# Altium PCB Custom_Keyboard.PcbDoc (part 2 of 4)
Units mil, origin at the board's own origin, x right, y up, seen from the top; angles counter-clockwise.
Board outline 4767 x 2153 mil, 2 copper layers (Top Layer, Bottom Layer), stack 57 mil thick; 298 components, 247 nets, 1117 pads, 576 vias.
Unrouted connection lines stored in the file: 2.
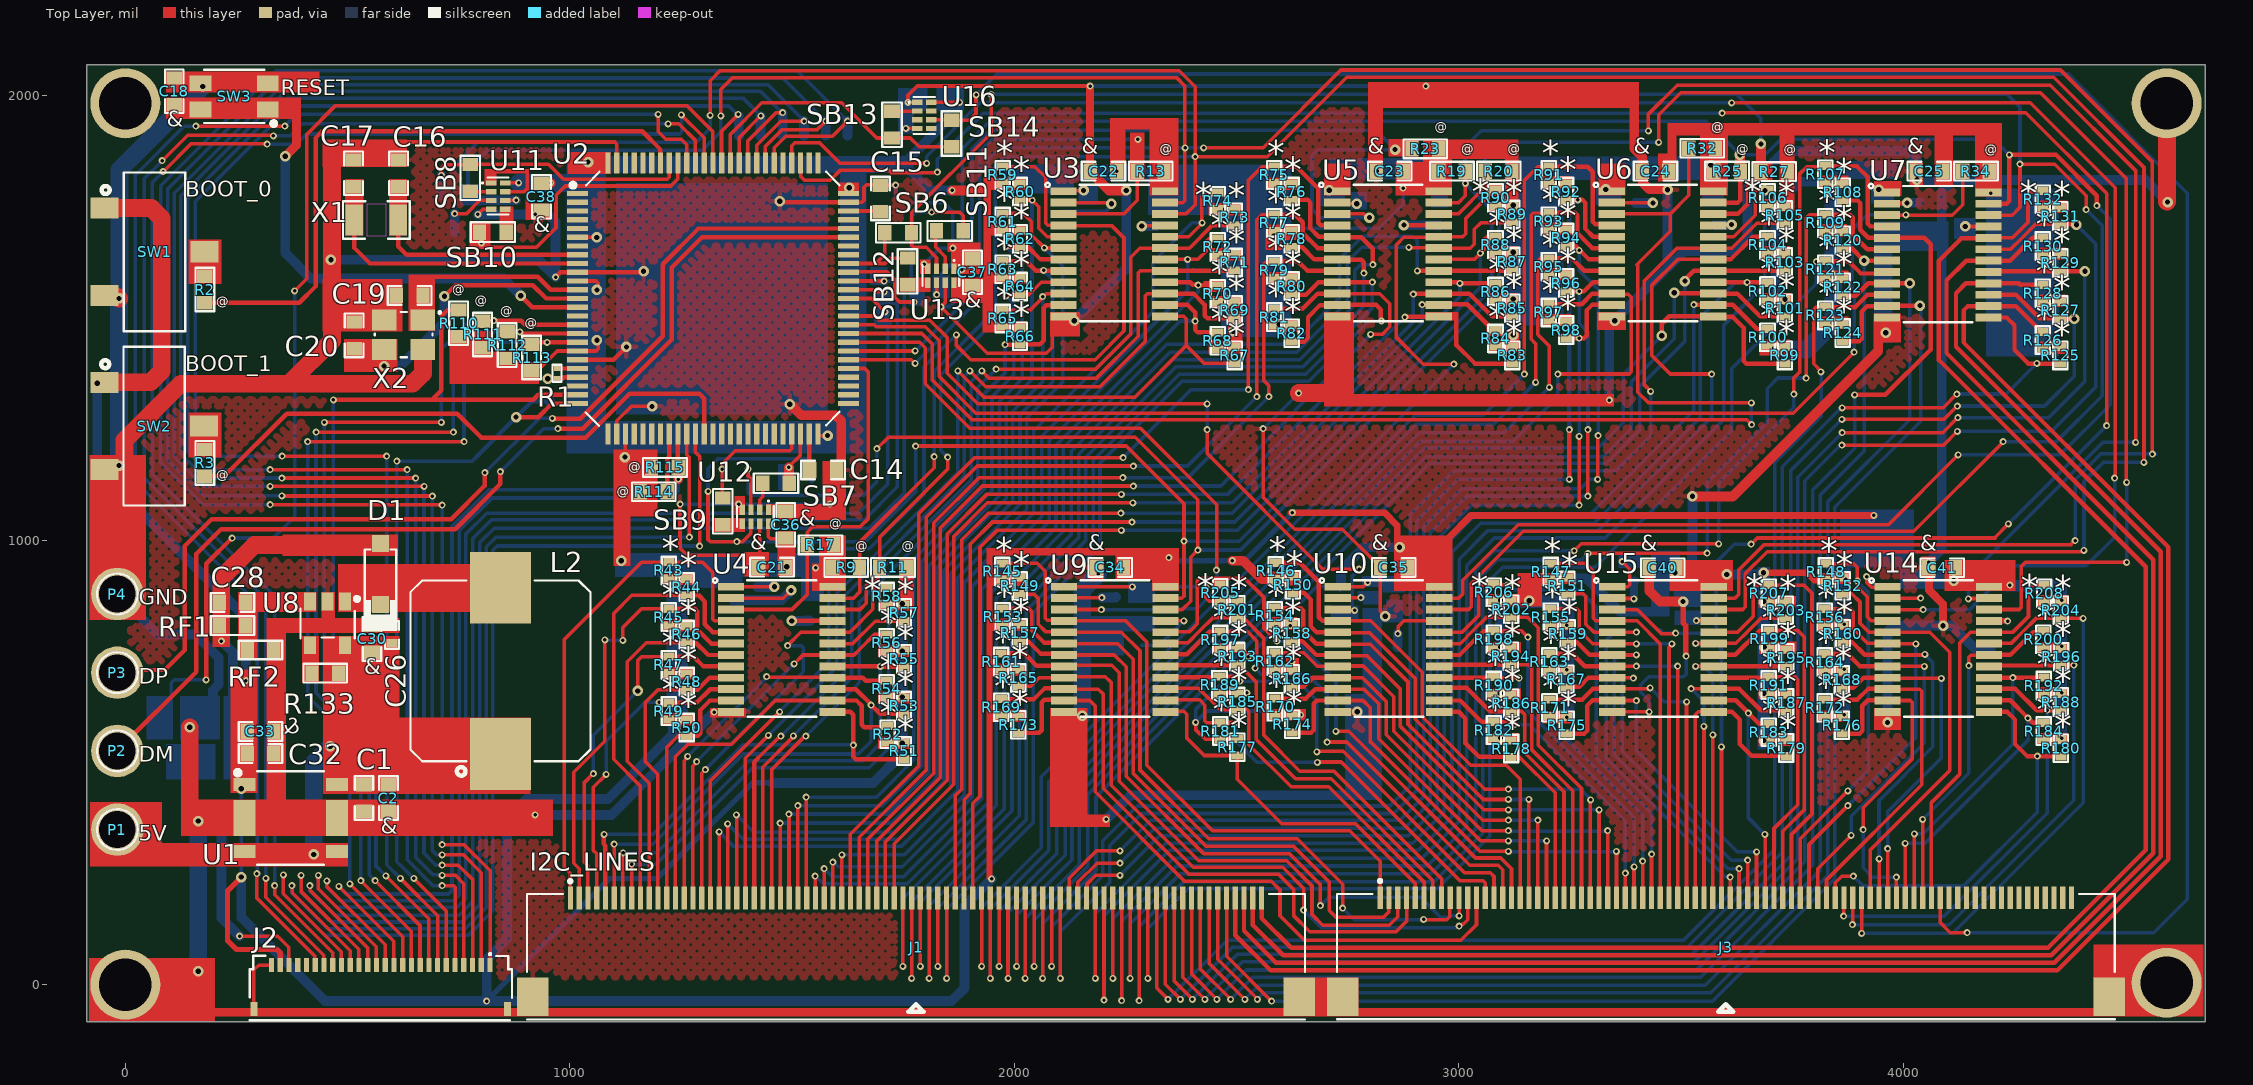
[diagram p0: Top Layer view]

## Part data (continued)
R1: library part RC0201JR-070RL, "RES SMD 0 OHM JUMPER 1/20W 0201", Case Code (Imperial)=0201, Case Code (Metric)=0603, Manufacturer=Yageo, Max Operating Temperature=125°C, Max Power Dissipation=50mW, Min Operating Temperature=-55°C, Package Quantity=10000, Resistance Tolerance=5%, Resistor Type="Thick Film", Supplier Part Number 1=311-0.0NCT-ND, Voltage Rating=25V, Case/Package=0201, Category="Chip SMD Resistors", ComponentLink1Description=https://datasheet.ciiva.com/7672/1563626-7672247.pdf?src-supplier=Element14, ComponentLink1URL=https://datasheet.ciiva.com/7672/1563626-7672247.pdf?src-supplier=Element14, ComponentLink2Description=https://datasheet.ciiva.com/7660/1421516-7660808.pdf?src-supplier=Element14, ComponentLink2URL=https://datasheet.ciiva.com/7660/1421516-7660808.pdf?src-supplier=Element14, ComponentLink3Description=https://datasheet.ciiva.com/7672/1563626-7672248.pdf?src-supplier=Element14, ComponentLink3URL=https://datasheet.ciiva.com/7672/1563626-7672248.pdf?src-supplier=Element14, ComponentLink4Description=https://datasheet.ciiva.com/16855/pyu-rc0201-51-rohs-l-8-16855994.pdf?src-supplier=Avnet+Europe, ComponentLink4URL=https://datasheet.ciiva.com/16855/pyu-rc0201-51-rohs-l-8-16855994.pdf?src-supplier=Avnet+Europe, ComponentLink5Description=https://datasheet.ciiva.com/28419/pyu-rc0201-51-rohs-l-8-28419660.pdf?src-supplier=Avnet+Europe, ComponentLink5URL=https://datasheet.ciiva.com/28419/pyu-rc0201-51-rohs-l-8-28419660.pdf?src-supplier=Avnet+Europe, ComponentLink6Description=https://datasheet.ciiva.com/46391/1421516-46391340.pdf?src-supplier=Element14, ComponentLink6URL=https://datasheet.ciiva.com/46391/1421516-46391340.pdf?src-supplier=Element14, ComponentLink7Description=https://datasheet.ciiva.com/8896/pyu-rc0201-51-rohs-l-8-8896143.pdf?src-supplier=Avnet, ComponentLink7URL=https://datasheet.ciiva.com/8896/pyu-rc0201-51-rohs-l-8-8896143.pdf?src-supplier=Avnet, Construction=Rectangular, Contact Plating=Tin,Matte, Depth=0.3mm, Features="Moisture Resistant", Height=0.01inch, Lead Free="Lead Free", Length=0.6mm, Manufacturer Part Number=RC0201JR-070RL, Military Standard=Not, Number of Terminations=2, Packaging="Tape and Reel", Power Rating=50mW, Pricing 1="1=0.10000, 10=0.03600, 25=0.02640, 50=0.02000, 100=0.01480, 250=0.01128, 500=0.00904, 1000=0.00665, 5000=0.00477 (USD)", Radiation Hardening=No, REACH SVHC=Unknown, Resistance=0R, RoHS=Yes, RoHS Compliant=Yes, Series=RC, Size Code=0201, Stock 1=11079, Supplier 1=Digi-Key, Termination=SMD/SMT, Tolerance=5%, Voltage Rating (DC)=25V, Weight=6E-06oz, Width=0.012inch
R2 R3 R6 R7 R8 R9 R10 R11 R12 R13 R14 R15 R16 R17 R18 R19 R20 R21 R22 R23 R24 R25 R26 R27 R28 R29 R30 R31 R32 R33 R34 R35 R36 R37 R38 R39 R40 R41 R42 R110 R111 R112 R113 R114 R115 R116 R117 R118 R119 R134 R135 R136 R137 R138 R139 R140 R141 R142 R143 R144: library part AC0603JR-0710KL, "RES SMD 10K OHM 5% 1/10W 0603", Case Code (Imperial)=0603, Case Code (Metric)=1608, Manufacturer=Yageo, Max Operating Temperature=155°C, Max Power Dissipation=100mW, Min Operating Temperature=-55°C, Package Quantity=1, Resistance=10kR, Resistor Type="Thick Film", Supplier Part Number 1=1029044, Temperature Coefficient=100ppm/°C, Tolerance=5%, Voltage Rating=50V, Case/Package=0603, Category="Chip SMD Resistors", ComponentLink1Description=https://datasheet.ciiva.com/5562/pyu-ac-51-rohs-l-2-5562553.pdf?src-supplier=Mouser, ComponentLink1URL=https://datasheet.ciiva.com/5562/pyu-ac-51-rohs-l-2-5562553.pdf?src-supplier=Mouser, Construction=Rectangular, Depth=0.8mm, Features="Moisture Resistant,Automotive AEC-Q200,Anti-Sulfur", Height=0.022inch, Lead Free="Lead Free", Length=0.063inch, Manufacturer Part Number=AC0603JR-0710KL, Military Standard=Not, Number of Terminations=2, Packaging="Tape and Reel", Power Rating=100mW, Pricing 1="5000=0.00540 (USD)", RoHS=Yes, RoHS Compliant=Yes, Series=AC, Size Code=0603, Stock 1=1533000, Supplier 1="Future Electronics", Termination=SMD/SMT, Width=0.031inch
R4 R5 R43 R44 R45 R46 R47 R48 R49 R50 R51 R52 R53 R54 R55 R56 R57 R58 R59 R60 R61 R62 R63 R64 R65 R66 R67 R68 R69 R70 R71 R72 R73 R74 R75 R76 R77 R78 R79 R80 R81 R82 R83 R84 R85 R86 R87 R88 R89 R90 R91 R92 R93 R94 R95 R96 R97 R98 R99 R100 R101 R102 R103 R104 R105 R106 R107 R108 R109 R120 R121 R122 R123 R124 R125 R126 R127 R128 R129 R130 R131 R132 R145 R146 R147 R148 R149 R150 R151 R152 R153 R154 R155 R156 R157 R158 R159 R160 R161 R162 R163 R164 R165 R166 R167 R168 R169 R170 R171 R172 R173 R174 R175 R176 R177 R178 R179 R180 R181 R182 R183 R184 R185 R186 R187 R188 R189 R190 R191 R192 R193 R194 R195 R196 R197 R198 R199 R200 R201 R202 R203 R204 R205 R206 R207 R208: library part RC0402FR-0747KL, "RES SMD 47K OHM 1% 1/16W 0402", Case Code (Imperial)=0402, Case Code (Metric)=1005, Manufacturer=Yageo, Max Operating Temperature=155°C, Max Power Dissipation=63mW, Min Operating Temperature=-55°C, Package Quantity=1, Power Rating=62.5mW, Resistance=47kR, Supplier Part Number 1=311-47.0KLRDKR-ND, Temperature Coefficient=100ppm/°C, Tolerance=1%, Voltage Rating=50V, Case/Package=0402, ComponentLink1Description=http://www.yageo.com/documents/recent/PYu-RC0402_51_RoHS_L_6_r.pdf?src-supplier=Future+Electronics, ComponentLink1URL=http://www.yageo.com/documents/recent/PYu-RC0402_51_RoHS_L_6_r.pdf?src-supplier=Future+Electronics, ComponentLink2Description=http://www.farnell.com/datasheets/1018594.pdf?src-supplier=Element14, ComponentLink2URL=http://www.farnell.com/datasheets/1018594.pdf?src-supplier=Element14, ComponentLink3Description=https://www.verical.com/server-webapp/html/getDatasheet?partID=323748&src-supplier=Verical, ComponentLink3URL=https://www.verical.com/server-webapp/html/getDatasheet?partID=323748&src-supplier=Verical, ComponentLink4Description=http://www.yageo.com/documents/recent/PYu-RC_Group_51_RoHS_L_10.pdf?src-supplier=Digi-Key, ComponentLink4URL=http://www.yageo.com/documents/recent/PYu-RC_Group_51_RoHS_L_10.pdf?src-supplier=Digi-Key, Composition="Thick Film", Depth=0.5mm, Features="Moisture Resistant", Height=0.016inch, Lead Free="Lead Free", Length=1mm, Manufacturer Part Number=RC0402FR-0747KL, Military Standard=Not, Number of Terminations=2, Packaging="Tape and Reel", Pricing 1="1=0.1, 10=0.016, 100=0.0064, 1000=0.00289, 2500=0.00251, 5000=0.00207 (USD)", REACH SVHC=Unknown, Stock 1=0, Supplier 1=Digi-Key, Termination=SMD/SMT, Width=0.5mm
R133: library part RMCF0603FT51K0, "Res Thick Film 0603 51K Ohm 1% 0.1W(1/10W) ±100ppm/C Pad SMD Automotive T/R", Case Code (Imperial)=0603, Case Code (Metric)=1608, Manufacturer="Stackpole Electronics", Max Operating Temperature=155°C, Max Power Dissipation=100mW, Min Operating Temperature=-55°C, Resistance=51kR, Resistor Type="Thick Film", Supplier Part Number 1=RMCF0603FT51K0CT-ND, Temperature Coefficient=100ppm/°C, Tolerance=1%, Case/Package=0603, Category="Chip SMD Resistors", ComponentLink1Description=http://components.arrow.com/part/dataview/40961090S7167716N1174?src-supplier=Arrow+Electronics, ComponentLink1URL=http://components.arrow.com/part/dataview/40961090S7167716N1174?src-supplier=Arrow+Electronics, ComponentLink2Description=https://www.seielect.com/catalog/SEI-RMCF_RMCP.pdf?src-supplier=Avnet, ComponentLink2URL=https://www.seielect.com/catalog/SEI-RMCF_RMCP.pdf?src-supplier=Avnet, ComponentLink3Description=https://www.seielect.com/catalog/SEI-Packaging.pdf?src-supplier=Digi-Key, ComponentLink3URL=https://www.seielect.com/catalog/SEI-Packaging.pdf?src-supplier=Digi-Key, Contact Plating=Tin,Matte, Features="Automotive AEC-Q200", Height=0.022inch, Length=0.061inch, Manufacturer Part Number=RMCF0603FT51K0, Mount="Surface Mount", Number of Terminations=2, Packaging="Tape and Reel", Pricing 1="1=0.10000, 10=0.01700, 100=0.00680, 1000=0.00305, 2500=0.00264 (USD)", Radiation Hardening=No, RoHS=Yes, RoHS Compliant=Yes, Series=RMCF, Stock 1=628549, Supplier 1=Digi-Key, Width=0.031inch
RF1: library part RC0603FR-0768KL, "RES SMD 68K OHM 1% 1/10W 0603", Case Code (Imperial)=0603, Case Code (Metric)=1608, Manufacturer=Yageo, Max Operating Temperature=155°C, Max Power Dissipation=100mW, Min Operating Temperature=-55°C, Package Quantity=1, Resistance=68kR, Supplier Part Number 1=311-68.0KHRCT-ND, Temperature Coefficient=100ppm/°C, Tolerance=1%, Voltage Rating=50V, Case/Package=0603, ComponentLink1Description=http://www.yageo.com/documents/recent/PYu-RC_Group_51_RoHS_L_10.pdf?src-supplier=Digi-Key, ComponentLink1URL=http://www.yageo.com/documents/recent/PYu-RC_Group_51_RoHS_L_10.pdf?src-supplier=Digi-Key, ComponentLink2Description=http://documents.rs-components.com/techlib://itc_doclist_GB.htm?stockno=5048243&src-supplier=RSComponents, ComponentLink2URL=http://documents.rs-components.com/techlib://itc_doclist_GB.htm?stockno=5048243&src-supplier=RSComponents, ComponentLink3Description=http://www.yageo.com/documents/recent/PYu-RC_Group_51_RoHS_L_9.pdf?src-supplier=Digi-Key, ComponentLink3URL=http://www.yageo.com/documents/recent/PYu-RC_Group_51_RoHS_L_9.pdf?src-supplier=Digi-Key, ComponentLink4Description=http://www.farnell.com/datasheets/1868787.pdf?src-supplier=Element14, ComponentLink4URL=http://www.farnell.com/datasheets/1868787.pdf?src-supplier=Element14, ComponentLink5Description=http://www.farnell.com/datasheets/443971.pdf?src-supplier=Element14, ComponentLink5URL=http://www.farnell.com/datasheets/443971.pdf?src-supplier=Element14, ComponentLink6Description=http://www.farnell.com/datasheets/2167052.pdf?src-supplier=Element14, ComponentLink6URL=http://www.farnell.com/datasheets/2167052.pdf?src-supplier=Element14, Composition="Thick Film", Depth=0.8mm, Features="Moisture Resistant", Height=0.022inch, Lead Free="Lead Free", Length=0.063inch, Manufacturer Part Number=RC0603FR-0768KL, Number of Pins=2, Number of Terminations=2, Packaging="Tape and Reel", Power Rating=100mW, Pricing 1="1=0.1, 10=0.023, 100=0.0094, 1000=0.00421, 2500=0.00366 (USD)", REACH SVHC=Unknown, Stock 1=3330967, Supplier 1=Digi-Key, Termination=SMD/SMT, Voltage Rating (DC)=50V, Width=0.031inch
RF2: library part AC0603FR-0713K3L, "RES SMD 13.3K OHM 1% 1/10W 0603", Case/Package=0603, Manufacturer=Yageo, Max Operating Temperature=155°C, Max Power Dissipation=100mW, Min Operating Temperature=-55°C, Resistance=13.3kR, Resistor Type="Thick Film", Supplier Part Number 1=13-AC0603FR-0713K3LCT-ND, Temperature Coefficient=100ppm/°C, Tolerance=1%, Category="Chip SMD Resistors", ComponentLink1Description=http://www.yageo.com/NewPortal/yageodocoutput?fileName=/pdf/R-Chip/PYu-AC_51_RoHS_L_6.pdf&src-supplier=Digi-Key, ComponentLink1URL=http://www.yageo.com/NewPortal/yageodocoutput?fileName=/pdf/R-Chip/PYu-AC_51_RoHS_L_6.pdf&src-supplier=Digi-Key, Features="Moisture Resistant,Automotive AEC-Q200", Height=0.022inch, Length=0.063inch, Manufacturer Part Number=AC0603FR-0713K3L, Number of Terminations=2, Packaging="Tape and Reel", Pricing 1="1=0.10000, 10=0.02900, 100=0.01170, 1000=0.00527, 2500=0.00458 (USD)", RoHS=Yes, RoHS Compliant=Yes, Stock 1=500, Supplier 1=Digi-Key, Width=0.031inch
SB1 SB2 SB3 SB4 SB5 SB6 SB7 SB8 SB9 SB10 SB11 SB12 SB13 SB14: "Solder Bridge ON"
SW1 SW2: "SPDT 50mA @ 12VDC 12V On-On SMD Toggle Switches RoHS", Contact Rating @ Voltage="50mA @ 12VDC", Manufacturer="XKB Connectivity", Operating Force=200±100gf, Package=SMD, Rated Voltage(DC)=12V, Actuator Orientation=Vertical, Actuator Type=Standard, Circuit=SPDT, Contact Finish=Silver, Contact Material=Brass, Electrical Life Cycles=10000, Mounting Type="Surface Mount", Switch Height=3mm
SW3: "3mm 2mm Round Button 50mA Top3.65mm SPST 12V SMD Tactile Switches", Manufacturer=XKB, Package=Custom, ComponentLink1Description=LCSC, ComponentLink1URL=https://lcsc.com/product-detail/Tactile-Switches_XKB-Connectivity-TS-1185EC-C-D-B_C318893.html, Manufacturer Part No=TS-1185EC-C-D-B
U1: "IC REG LINEAR 3.3V 1A 6HSOP", Manufacturer=ABLIC, Supplier Part Number 1=1662-1407-1-ND, Category="Voltage Regulators - Linear", Manufacturer Part Number=S-1172B33-E6T1U, Pricing 1="1=1.61000, 10=1.43800, 25=1.36520, 100=1.12150, 250=1.04832, 500=0.92644, 1000=0.73140 (USD)", RoHS=Yes, RoHS Compliant=Yes, Stock 1=7813, Supplier 1=Digi-Key
U2: "IC MCU 32BIT 1MB FLASH 100LQFP", Case/Package=LQFP, Frequency=168MHz, Manufacturer=STMicroelectronics, Max Operating Temperature=105°C, Max Power Dissipation=465mW, Min Operating Temperature=-40°C, Category=Microcontrollers, ComponentLink1Description=https://datasheet.ciiva.com/48494/dm00037051-48494023.pdf?src-supplier=Avnet, ComponentLink1URL=https://datasheet.ciiva.com/48494/dm00037051-48494023.pdf?src-supplier=Avnet, Core Architecture=ARM, Data Bus Width=32b, Interface=I2C,SPI,USB,CAN,Ethernet,IrDA,UART,USART,LIN,EBI/EMI,I2S, Manufacturer Part Number=STM32F407VGT7TR, Max Frequency=168MHz, Memory Size=1MB, Memory Type=FLASH, Number of I/Os=82, Number of Pins=100, Number of Programmable I/O=82, Number of Timers/Counters=14, Oscillator Type=Internal, Packaging="Tape and Reel", Peripherals="Brown-out Detect/Reset,POR,PWM,WDT,DMA,LCD", Pricing 1="1000=8.54203, 2000=8.32301, 4000=8.19785, 6000=8.07269, 8000=7.97882, 10000=7.82238, 100000=7.69722 (USD)", Radiation Hardening=No, RAM Size=196KB, RoHS=Yes, RoHS Compliant=Yes, Supplier 1=Avnet, Supplier Part Number 1=STM32F407VGT7TR, Watchdog Timer=Yes
U3 U4 U5 U6 U7 U9 U10 U14 U15: "IC BUS SWITCH 1 X 8:1 24TSSOP", Case/Package=TSSOP, Manufacturer="Texas Instruments", Max Operating Temperature=85°C, Max Supply Current=80uA, Max Supply Voltage=5.5V, Min Operating Temperature=-40°C, Min Supply Voltage=1.65V, On-State Resistance=70R, Package Quantity=1, Supplier Part Number 1=296-34905-1-ND, Category="Decoders and Multiplexers", ComponentLink1Description=https://datasheet.ciiva.com/6614/tca9548a-6614721.pdf?src-supplier=Digi-Key, ComponentLink1URL=https://datasheet.ciiva.com/6614/tca9548a-6614721.pdf?src-supplier=Digi-Key, Contact Plating=Gold, Independent Circuits=1, Lead Free="Lead Free", Manufacturer Part Number=TCA9548APWR, Mount="Surface Mount", Number of Pins=24, Packaging="Tape and Reel", Pricing 1="1=2.09000, 10=1.87600, 25=1.77040, 100=1.50820, 250=1.41616, 500=1.23914, 1000=1.16900 (USD)", REACH SVHC="No SVHC", RoHS=Yes, Supplier 1=Digi-Key, Supply Type=Single
U8: "IC REG BOOST ADJ 0.8A SOT23-5", Case/Package=SOT-23-5, Manufacturer="TI National Semiconductor", Max Input Voltage=14V, Max Operating Temperature=125°C, Max Output Current=800mA, Max Output Voltage=28V, Min Input Voltage=2.7V, Min Operating Temperature=-40°C, Min Output Voltage=4V, Output Power=2.5W, Package Quantity=1, Quiescent Current=2.1mA, Supplier Part Number 1=926-LM27313XMF/NOPB, Switching Frequency=1.6MHz, Category="Voltage Regulators - Switching", ComponentLink1Description=https://datasheet.ciiva.com/22669/1775263-22669473.pdf?src-supplier=Element14, ComponentLink1URL=https://datasheet.ciiva.com/22669/1775263-22669473.pdf?src-supplier=Element14, ComponentLink2Description=https://datasheet.ciiva.com/27056/2038467-27056413.pdf?src-supplier=Jameco, ComponentLink2URL=https://datasheet.ciiva.com/27056/2038467-27056413.pdf?src-supplier=Jameco, ComponentLink3Description=https://datasheet.ciiva.com/23605/37176-23605316.pdf?src-supplier=Newark, ComponentLink3URL=https://datasheet.ciiva.com/23605/37176-23605316.pdf?src-supplier=Newark, ComponentLink4Description=https://datasheet.ciiva.com/25627/0900766b810fa43d-25627220.pdf?src-supplier=RSComponents, ComponentLink4URL=https://datasheet.ciiva.com/25627/0900766b810fa43d-25627220.pdf?src-supplier=RSComponents, ComponentLink5Description=https://datasheet.ciiva.com/15113/getdatasheetpartid-203533-15113382.pdf?src-supplier=Verical, ComponentLink5URL=https://datasheet.ciiva.com/15113/getdatasheetpartid-203533-15113382.pdf?src-supplier=Verical, ComponentLink6Description=https://datasheet.ciiva.com/3220/lm27313-q1-3220064.pdf?src-supplier=Avnet, ComponentLink6URL=https://datasheet.ciiva.com/3220/lm27313-q1-3220064.pdf?src-supplier=Avnet, ComponentLink7Description=https://datasheet.ciiva.com/6603/lm27313-6603792.pdf?src-supplier=Digi-Key, ComponentLink7URL=https://datasheet.ciiva.com/6603/lm27313-6603792.pdf?src-supplier=Digi-Key, ComponentLink8Description=https://datasheet.ciiva.com/6603/lm27313-6603791.pdf?src-supplier=Digi-Key, ComponentLink8URL=https://datasheet.ciiva.com/6603/lm27313-6603791.pdf?src-supplier=Digi-Key, ComponentLink9Description=https://datasheet.ciiva.com/6603/lm27313-6603788.pdf?src-supplier=Digi-Key, ComponentLink9URL=https://datasheet.ciiva.com/6603/lm27313-6603788.pdf?src-supplier=Digi-Key, Contact Plating=Tin, Efficiency=80%, Height=1.02mm, Lead Free="Lead Free", Length=2.92mm, Manufacturer Part Number=LM27313XMF/NOPB, Mount="Surface Mount", Number of Outputs=1, Number of Pins=5, Output Configuration=Positive, Output Current=800mA, Output Type=Adjustable, Output Voltage=28V, Packaging="Tape and Reel", Pricing 1="1=2.17000, 10=1.96000, 25=1.85000, 50=1.85000, 100=1.58000, 250=1.48000, 500=1.30000, 1000=1.07000, 10000=1.07000 (USD)", Radiation Hardening=No, REACH SVHC="No SVHC", RoHS=Yes, RoHS Compliant=Yes, Series=LM27313, Supplier 1=Mouser, Synchronous Rectifier=No, Topology=Boost, Width=1.6mm
U11 U12 U13 U16: "IC BUFFER NON-INVERT 5.5V 8DFN", High Level Output Current=32mA, Manufacturer=Diodes, Max Operating Temperature=125°C, Min Operating Temperature=-40°C, Supplier Part Number 1=74LVC2G125HD4-7DIDKR-ND, Category="Logic Gates", ComponentLink1Description=https://www.diodes.com/assets/Datasheets/74LVC2G125.pdf?src-supplier=Digi-Key, ComponentLink1URL=https://www.diodes.com/assets/Datasheets/74LVC2G125.pdf?src-supplier=Digi-Key, Logic Function=Buffer,Inverting, Low Level Output Current=32mA, Manufacturer Part Number=74LVC2G125HD4-7, Mount="Surface Mount", Number of Bits per Element=1, Number of Elements=2, Number of Pins=8, Packaging="Tape and Reel", Pricing 1="1=0.47000, 10=0.35300, 25=0.30880, 100=0.19980, 250=0.16536, 500=0.13228, 1000=0.10142, 2500=0.08819 (USD)", RoHS=Yes, RoHS Compliant=Yes, Supplier 1=Digi-Key
X1: library part Q13FC1350000200, "32.768kHz SMD Crystal Resonator 7pF 70kΩ ±20ppm", Equivalent Series Resistance (ESR)=70kΩ, Frequency=32.768kHz, Load Capacitance=7pF, Manufacturer="Seiko Epson", Crystal Type="SMD Crystal Resonator"
X2: library part S3225000101040, "25MHz SMD Crystal Resonator 10pF 40Ω ±10ppm", Equivalent Series Resistance (ESR)=40Ω, Load Capacitance=10pF, Manufacturer=JGHC, Crystal Type="SMD Crystal Resonator", Frequency=25MHz

## Free pads (board coordinates)
  round 157.48 hole 118.11: MH1(0,0) MH2(4593,4) MH3(4593,1983) MH4(0,1983)

## Via types
v1: diameter 15.75, hole 7.87, Top Layer to Bottom Layer, tented both sides, 451 vias
v2: diameter 23.62, hole 11.81, Top Layer to Bottom Layer, tented both sides, 125 vias

## Nets (pads, with @x,y where several pads share a name; then routed paths per layer and width w, separated by ;. In a path a pad name is that pad's centre, name@x,y a point inside that pad or via, vN(x,y) a via of type N, cw(c..) or ccw(c..) an arc to the next point about the centre after c; other vN are vias at no path point)
BOOT0: R2.1 U2.94 | length 1427.5
  Top Layer w10: R2.1@179,1534 391,1534 428,1571 428,1905 443,1920 1163,1920 1204,1879 U2.94@1204,1849
BOOT1: R3.1 U2.37 | length 1329.6
  Top Layer w10: R3.1@179,1144 222.14,1144 363.02,1284.87 747.13,1284.87 801,1231 1036,1231 1135,1330 1291,1330 1302.43,1318.57 U2.37@1302.43,1238.76
COl_1: J2.1 R6.1 U2.81 | length 4363.3
  Top Layer w8: v1(326,1080) 326.5,1079.5 712.5,1079.5 v1(713,1079) ; v1@709.13,315 v1(713,315) 762,315 820.76,256.24 J2.1@820.76,44 ; U2.81@1459.91,1849 1459.91,1882.91 1486,1909 1591,1909 v1(1625,1943)
  Bottom Layer w8: v1(326,1080) 175,1080 80,1175 80,1797.56 338.44,2056 1512,2056 v1(1625,1943) ; v1(713,315) v1(713,1079)
  Bottom Layer w22: R6.1@1625,1910 v1(1625,1943)
COl_2: J2.2 R37.1 U2.82 | length 4233.3
  Top Layer w8: v1(352,1100) 352.5,1099.5 690.5,1099.5 v1(691,1099) ; v1@709.13,292 v1(713,292) 761,292 801.08,251.92 J2.2@801.08,44 ; U2.82@1440.22,1849 1440.22,1886.22 1478,1924 1557,1924 v1(1576,1943)
  Bottom Layer w8: v1(352,1100) 176.21,1100 95,1181.21 95,1790 345,2040 1479,2040 v1(1576,1943) ; v1(691,1099) 691,301 700,292 v1(713,292)
  Bottom Layer w22: R37.1@1576,1910 v1(1576,1943)
COl_3: J2.3 R38.1 U2.83 | length 4093
  Top Layer w8: v1(326,1121) v1(672,1121) ; v1@709.13,269 v1(713,269) 749,269 781.39,236.61 J2.3@781.39,44 ; U2.83@1420.54,1849 1420.54,1888.54 1475,1943 v1(1527,1943)
  Bottom Layer w8: v1(326,1121) 177,1121 110,1188 110,1781 354,2025 1446,2025 v1@1528,1943 ; v1(672,1121) 672,295.69 698.69,269 v1(713,269)
  Bottom Layer w22: R38.1@1527,1910 v1(1527,1943)
COl_4: J2.4 R39.1 U2.84 | length 3982.8
  Top Layer w8: v1(352,1140) v1(653,1140) ; v1@709.13,246 v1(713,246) 743,246 761.71,227.29 J2.4@761.71,44 ; U2.84@1400.9,1847.28 1400.9,1898.9 1464,1962 v1(1479,1962)
  Bottom Layer w8: v1(352,1140) 179.57,1140 125,1194.57 125,1774.64 360.36,2010 1429,2010 v1@1479,1960 ; v1(653,1140) 653,287 693.13,246.87 712.13,246.87 v1(713,246)
  Bottom Layer w22: R39.1@1478,1910 1479,1911 v1@1479,1960
COl_5: J2.5 R40.1 U2.85 | length 3836.5
  Top Layer w8: v1(326,1159) v1(634,1159) ; v1(713,223) 738,223 742.02,218.98 J2.5@742.02,44 ; U2.85@1381.17,1849 1381.17,1906.17 v1(1430,1955)
  Bottom Layer w8: v1(326,1159) 181.79,1159 140,1200.79 140,1768.43 365.57,1994 1391,1994 v1(1430,1955) ; v1(634,1159) 634,281 692,223 v1(713,223)
  Bottom Layer w22: R40.1@1429,1909 v1@1429,1954
COl_6: J2.6 R41.1 U2.25 | length 1731
  Top Layer w8: v1(649,239) 722.34,165.66 J2.6@722.34,44
  Top Layer w10: v2(879,1277) 929.34,1277 960,1307.66 U2.25@1016.99,1307.66
  Bottom Layer w8: v1(649,239) 648.59,239 622.49,265.09 611,276.59 v1(611,1178) 780,1178 789,1187
  Bottom Layer w10: 789,1187 v2(879,1277) 914.31,1312.31 R41.1@954.31,1312.31
  Bottom Layer w22: R41.1@954.31,1312.31 R41.1@955,1313
COl_7: J2.7 R42.1 U2.87 | length 3679.7
  Top Layer w8: v1(353,1189) v1(588,1189) ; v1(619,239) 702.65,155.35 J2.7@702.65,44 ; U2.87@1341.8,1849 1341.4,1849.4 1341.4,1920.4 v1(1379,1958)
  Bottom Layer w8: v1(353,1189) 173,1189 157,1205 157,1762 372,1977 1358,1977 v1@1380,1955 ; v1(588,1189) 588,270 v1(619,239) ; R42.1@1380,1909 R42.1@1380.8,1909.8
  Bottom Layer w22: v1@1380,1955 1380,1910.59 R42.1@1380.8,1909.8
COl_8: J2.8 R110.1 U2.24 | length 2163.6
  Top Layer w8: v1(586,245) 682.97,148.03 J2.8@682.97,44
  Top Layer w10: v1@467,1316 v1(468,1316) 690,1316 ; R110.1@750,1518 725,1518 711,1504 711,1337 690,1316 ; R110.1@761,1516 761,1520.19 R110.1@762.5,1521.69 ; U2.24@1016.99,1327.35 929.35,1327.35 918,1316 690,1316
  Bottom Layer w8: v1(468,1316) 468,668 564,572 564,267 v1(586,245)
COl_9: J2.9 R111.1 U2.16 | length 2089.2
  Top Layer w8: v1(448,1265) v1(711,1265) ; v1(562,234) 663,133 663,44.28 J2.9@663.28,44
  Top Layer w10: R111.1@814,1494 v1(829,1494) 890.94,1494 900.11,1484.83 U2.16@1016.99,1484.83
  Bottom Layer w8: v1(448,1265) 448,661 549,560 549,247 v1(562,234) ; v1(711,1265) 711,1429.61 775.39,1494 v1(829,1494)
COl_10: J2.10 R112.1 U2.17 | length 2096.5
  Top Layer w8: v1(429,1243) v1(738,1243) ; v1(530,234) 643.6,120.4 J2.10@643.6,44
  Top Layer w10: R112.1@864,1469 v1(887.83,1469) 889.39,1469 893.25,1465.14 U2.17@1016.99,1465.14
  Bottom Layer w8: 429,1235 429,656.57 530,555.57 v1(530,234) ; v1(738,1243) 738,1430 777,1469 v1(887.83,1469)
COl_11: J2.11 R113.1 U2.18 | length 2121
  Top Layer w8: v1(410.13,1222) v1(762,1222) ; v1(505,227) 623.91,108.09 J2.11@623.91,44
  Top Layer w10: R113.1@914,1441 918.46,1445.46 U2.18@1016.99,1445.46
  Bottom Layer w8: v1(410.13,1222) 410.13,648.87 505,554 v1(505,227) ; v1(762,1222) 762,1424 783,1445 v1(949,1445)
COl_12: J2.12 R114.1 U2.33 | length 1957.3
  Top Layer w8: v1(480.54,221.13) 604.23,97.43 J2.12@604.23,44
  Top Layer w10: R114.1@1219,1118.87 1219,1182.81 1223.69,1187.5 U2.33@1223.69,1238.76
  Top Layer w22: R114.1@1219,1109 v1(1219,1113.87)
  Bottom Layer w8: v1(480.54,221.13) 497.66,204 727,204 735,212 735,1031 817.44,1113.44 1218.56,1113.44 v1(1219,1113.87)
COl_13: J2.13 R115.1 U2.34 | length 2051.4
  Top Layer w8: v1(453.43,233.57) 453,233.15 453,221 584.54,89.46 J2.13@584.54,44
  Top Layer w10: U2.34@1243.37,1238.76 1243.37,1164.63 R115.1@1244,1164
  Top Layer w22: R115.1@1244,1164 1244.09,1163.91 v1(1244.09,1137.43)
  Bottom Layer w8: v1(453.43,233.57) 453.43,219.57 484,189 739,189 751,201 751,1021 825,1095 1227.25,1095 1244.09,1111.83 v1(1244.09,1137.43)
COl_14: J2.14 R116.1 U2.63 | length 2922.1
  Top Layer w8: v1(434.17,246.13) 434.17,215.83 564.86,85.14 J2.14@564.86,44 ; U2.63@1627.23,1543.88 1679.12,1543.88 v1(1709,1514.02)
  Bottom Layer w8: v1(434.17,246.13) 434.17,215.83 476,174 747,174 766,193 766,1014 813,1061 1650,1061 1715,1126 1715,1494
COl_15: J2.15 R117.1 U2.64 | length 2975.2
  Top Layer w8: v1(415,223) 415.89,222.11 415.89,211.79 545.17,82.5 J2.15@545.17,44 ; U2.64@1627.23,1563.57 1683.13,1563.57 1687.69,1559 v1(1707,1559)
  Bottom Layer w8: v1(415,223) 415.55,222.45 415.55,211.45 470.87,156.13 751.13,156.13 782,187 782,1004 824,1046 1663,1046 1737,1120 1737,1528.66 1732.31,1533.34 1721,1533.34
COl_16: J2.16 R118.1 U2.65 | length 3148
  Top Layer w8: v1(395.33,246.13) 395.33,209.67 525.49,79.51 J2.16@525.49,44 ; U2.65@1627.23,1583.25 v1@1707,1583.25
  Bottom Layer w8: v1(395.33,246.13) 395.33,209.67 464,141 758,141 797,180 797,994 830,1027 1673,1027 1753,1107 1753,1567 1737,1583 v1(1707,1583)
DM: P2.1 U2.70 | length 2390.5
  Top Layer w10: P2.1@-18,526 160,704 160,969.67 215.33,1025 742,1025 844,1127 v1(844,1154.24) ; v1(973,1251) 1029.23,1251 1229,1450.77 1229,1613 1297.68,1681.68 U2.70@1627.23,1681.68
  Bottom Layer w8: v1(844,1154.24) 940.76,1251 v1(973,1251)
DP: P3.1 U2.71 | length 2309.1
  Top Layer w10: P3.1@-18,702 -12,708 89,708 134,753 134,987 194,1047 733,1047 809,1123 v1(809,1152) ; v1(961,1274) 962,1273 1023.39,1273 1209.31,1458.93 1209.31,1621.15 1289.52,1701.36 U2.71@1627.23,1701.36
  Bottom Layer w8: v1(809,1152) 931,1274 v1(961,1274)
FB: C28.1 RF1.2 RF2.2 U8.3
GND: C1.2 C2.2 C3.2 C4.2 C5.2 C6.2 C7.2 C8.2 C9.2 C10.2 C11.2 C12.2 C13.2 C14.2 C15.2 C16.1 C17.1 C18.2 C19.1 C20.1 C21.2 C22.2 C23.2 C24.2 C25.2 C26.2 C27.2 C29.2 C30.2 C31.2 C32.2 C33.2 C34.2 C35.2 C36.2 C37.2 C38.2 C39.2 C40.2 C41.2 J1.MP1 J1.MP2 J2.26 J2.MP1 J2.MP2 J3.MP1 J3.MP2 P4.1 pad.MH1 pad.MH2 pad.MH3 pad.MH4 Q2.2 R5.1 R7.2 R8.2 R21.2 R22.2 R24.2 R28.2 R33.2 R36.2 R119.2 R134.2 R136.2 R139.2 R143.2 R144.2 RF2.1 SW1.3 SW2.3 SW3.2 U1.2 U1.5 U2.10 U2.20 U2.27 U2.74 U2.99 U3.12 U4.12 U5.12 U6.12 U7.12 U8.2 U9.12 U10.12 U11.1 U11.4 U11.7 U12.1 U12.4 U12.7 U13.1 U13.4 U13.7 U14.12 U15.12 U16.1 U16.4 X2.2 X2.4 | length 17205.4
  Top Layer w8: J2.MP1@289.27,-54.43 289.27,33.27 300,44 J2.26@328.64,44 ; 538.86,1871 563.86,1896 1100.89,1896 1105.57,1891.31 U2.99@1105.57,1849 ; v1(793,1733) 804.63,1744.63 822.68,1744.63 U11.4@823,1744.94 ; U11.7@854.5,1784.32 896.31,1784.32 904,1792 ; 904,1829 904,1792 ; 905,1728 904,1729 904,1792 ; U2.27@1105.57,1238.76 1105.92,1239.11 1105.92,1268.92 1138,1301 v2(1185,1301) ; v1@1248,1085 v1(1248,1081) 1248,982 1264,966 1405,966 ; 1380,1090 1381.48,1088.52 1381.48,1081.37 1387.94,1074.91 U12.4@1387.94,1069 ; 1421.5,960.5 1427.31,966.32 U12.7@1427.31,1037.5 ; U2.74@1629.13,1762.32 U2.74@1627.23,1760.42 1657.42,1760.42 1662,1765 1662,1794.31 1667.69,1800 C15.2@1692,1800 ; C15.2@1699,1799 v1(1733,1799) ; v1(1756.34,1926.66) 1781.66,1926.66 U16.4@1782,1926.32 ; U16.1@1782,1985.37 1781.81,1985.19 1761.19,1985.19 v1(1761,1985) 1761,2001 1782,2022 v1(2171,2022) ; U13.4@1803.57,1612.65 U13.4@1805.47,1610.75 ; U13.7@1844.84,1579.25 1844.84,1534.84 v1(1835,1525) 1939,1421 2072,1421 2085.5,1434.5 2085.5,1462 2109,1485.5 2114.5,1485.5 ; v1(2560,1251) 2560,1096 2631,1025 2738,1025 2810.5,952.5 2813,952.5 2824,941.5 C35.2@2824,939 2824,840 v2(2835,829) ; U15.12@3345.65,613.75 v1(3428.75,613.75)
  Top Layer w10: v1(968,1592) 978.94,1602.94 U2.10@1016.99,1602.94 v2@1168.91,1602.94 ; U2.20@1016.99,1406.09 1098.59,1406.09 v2(1127.5,1435) ; v2@1475.31,1760.42 U2.74@1627.23,1760.42
  Top Layer w12: v2(3505,862) 3505,814 3511,808 v1@3511,739
  Top Layer w16: U10.12@2728.25,614 2728.37,613.88 2771.88,613.88 v2(2772,614)
  Top Layer w18: C22.2@2171,1830.5 v1@2171,2021 ; C41.2@4058,938 4058,888 4090,856 v2(4090,807.81) v2@4090,806.81
  Top Layer w22: 145,406 153,398 ; v2@1498,1304 1521,1281 1598.11,1281 1611,1268.11 1611,1171.5 1600,1160.5 C14.2@1600,1158 ; C22.2@2177.5,1823 2213.5,1787 v2(2252,1787) ; 2813,1873.5 2819,1879.5 ; v2@3345,1493 3346,1494 v2(3351,1494) ; 3395,1979 3395,1881 3413,1863 C24.2@3413,1830.5 3413,1829 3415,1827 3415,1803.89 3429.39,1789.5 3469.19,1789.5 v2(3470,1788.69) ; C40.2@3429,938 3429,886 3453,862 v2(3505,862) ; v2(3526,1099) 3526.31,1098.69 3616.69,1098.69 3944,1426 3944,1491 ; C25.2@4029,1824 4031,1822 v2(4031,1811)
  Top Layer w40: SW2.3@-46.41,1160.57 SW2.3@-43.83,1158 ; SW1.3@-46.41,1550.57 -42.79,1546.95 -16.95,1546.95 v2(-14,1544) ; -2,1168 -2,1225 125,1352 368,1352 ; 145,406 v2(145,579) ; 465,1857 465,1449 368,1352 ; X2.4@669.61,1429 669.61,1375.43 646.18,1352 368,1352 ; v1(2640,1331) 2705,1331 ; v2@4594,1762 pad.MH3@4594,1983
  Bottom Layer w8: v1(1248,1081) v1(1380,1081) v1(1585,1081) ; v1(1733,1799) 1733,1771 1745.1,1758.9 1842.1,1758.9 1862,1739 v1(1862,1657) 1833,1657 v1(1797,1621) ; v1(1835,1525) 1835.87,1525.87 1854.87,1525.87 1882,1553 v1(1882,1609) ; v1(2171,2022) v1(2926,2022) ; v1(2560,1251) v1(2640,1331) ; v1(3428.75,613.75) 3428.75,639.25 3410,658 3410,675 3428,693 3506.31,693 3512,698.69 v1(3512,739)
  Bottom Layer w22: P4.1@-18,879 73.19,787.81 158.19,787.81 210,736 210,675 197.08,662.08 197.08,629.08 C27.2@196,628 ; v2(462.54,1631) 929,1631 v1(968,1592) 968,1716 951,1733 v1(922,1733) v1(793,1733) ; v1(922,382) 1094,382 v1(1325,613) ; v2(2135,1494) 2252,1611 v2(2252,1787) ; v1(2207,372) 2261,426 2782,426 ; 2782,534.5 2782,426 ; 2806,426 2782,426 ; v1(3339,1315) 3339,1481.56 3351,1493.56 v2(3351,1494) 3461.35,1604.35 ; v2@3470,1788.25 3470,1613 3507,1650 3620,1650 3650,1680 3650,1793 3733,1876 4010,1876 4030.69,1855.31 4030.69,1811.31 v2(4031,1811) ; R144.2@3504,884 3506.5,884 R144.2@3510.5,888 ; 3525,892.69 3525,995.13 3526,996.13 v2(3526,1099) ; v2(3965,590) 3965,795.06 3977.89,807.94 4012.94,807.94 R139.2@4013,808 4109.35,808 4161.59,755.76 4196.76,755.76 R143.2@4197,756 ; 4014.5,1684 4065,1684 4087,1662 4087,980 v1(4058,951) ; v2@4031.31,1810.69 4112.69,1810.69 ; R36.2@4087,1703.5 4087,1785 4112.69,1810.69 ; v2(4595,1761) 4545.31,1810.69 4112.69,1810.69
  Bottom Layer w40: v2(-14,1168) v2(-14,1544) -13,1545 -13,1833.77 v2(174.23,2021) ; v2(164,30) v2(164,368) ; v2(2153,605) 2153.09,605.09 2153.09,759.49 ; 2189,764 R28.2@2227,764 ; v1(2189,924) 2153.09,888.09 2153.09,809 2177.09,785 2189.5,785
  other v2: 1495,1306 3961,1467 1165.91,1604.94 1472.31,1762.42 2815,1830.5
I2C1_SCL: SB2.1 SB10.1 U2.92 | length 616.7
  Top Layer w8: 793,1659 925,1659 969,1703 969,1776 990,1797 1227,1797 1243.37,1813.37 U2.92@1243.37,1849
  Bottom Layer w22: v1(801,1669) SB2.1@801,1693
I2C1_SCL#: R11.2 SB2.2 U3.22 U4.22 U11.3 U15.22 | length 8269.6
  Top Layer w8: v1(741,1735) 768,1735 797.63,1764.63 U11.3@823,1764.63 ; v1(1316,1956) 1316,2034 1338,2056 2371.21,2056 2407,2020.21 v1(2407,1863) ; U4.22@1591.17,844.07 1653.07,844.07 1667,858 1667,897 1677,907 1688,907 1694,913 1694,936 R11.2@1697,939 1697,1007 1850,1160 v1(1850,1187) ; U3.22@2339.17,1734.07 2386.07,1734.07 2407,1755 v1(2407,1863) ; U15.22@3574,844.07 3639.07,844.07 3645,850 3645,925 3694,974 v1@4407,974 ; v1(4542,1175) 4542,1838.72 4338.72,2042 2748,2042 2569,1863 v1(2407,1863)
  Bottom Layer w8: v1(741,1735) 741,1844 792,1895 1284,1895 1316,1927 v1(1316,1956) ; v1(1850,1187) 1835,1202 1835,1372 1957.26,1494.26 1957.26,1841.26 1979,1863 v1(2407,1863) ; v1(4407,977) 4407,1132 4450,1175 v1@4535,1175
  Bottom Layer w22: SB2.2@741,1693 v1(741,1735)
I2C1_SDA: SB1.1 SB8.1 U2.93 | length 625.1
  Top Layer w8: v1(711,1821) 711,1838 718.31,1845.32 SB8.1@776,1845.32 ; SB8.1@776,1846 952,1846 986,1812 1219,1812 1223.69,1816.69 U2.93@1223.69,1849
  Bottom Layer w22: SB1.1@711,1777 v1(711,1821)